# Altium PCB 数控电源.PcbDoc (part 3 of 4)
Units mm, origin at the board's own origin, x right, y up, seen from the top; angles counter-clockwise.
Board outline 99.32 x 99.37 mm, 4 copper layers (Top Layer 1, GND, POWER, Bottom Layer), stack 0.603 mm thick; 325 components, 180 nets, 929 pads, 616 vias.
Unrouted connection lines stored in the file: 13.
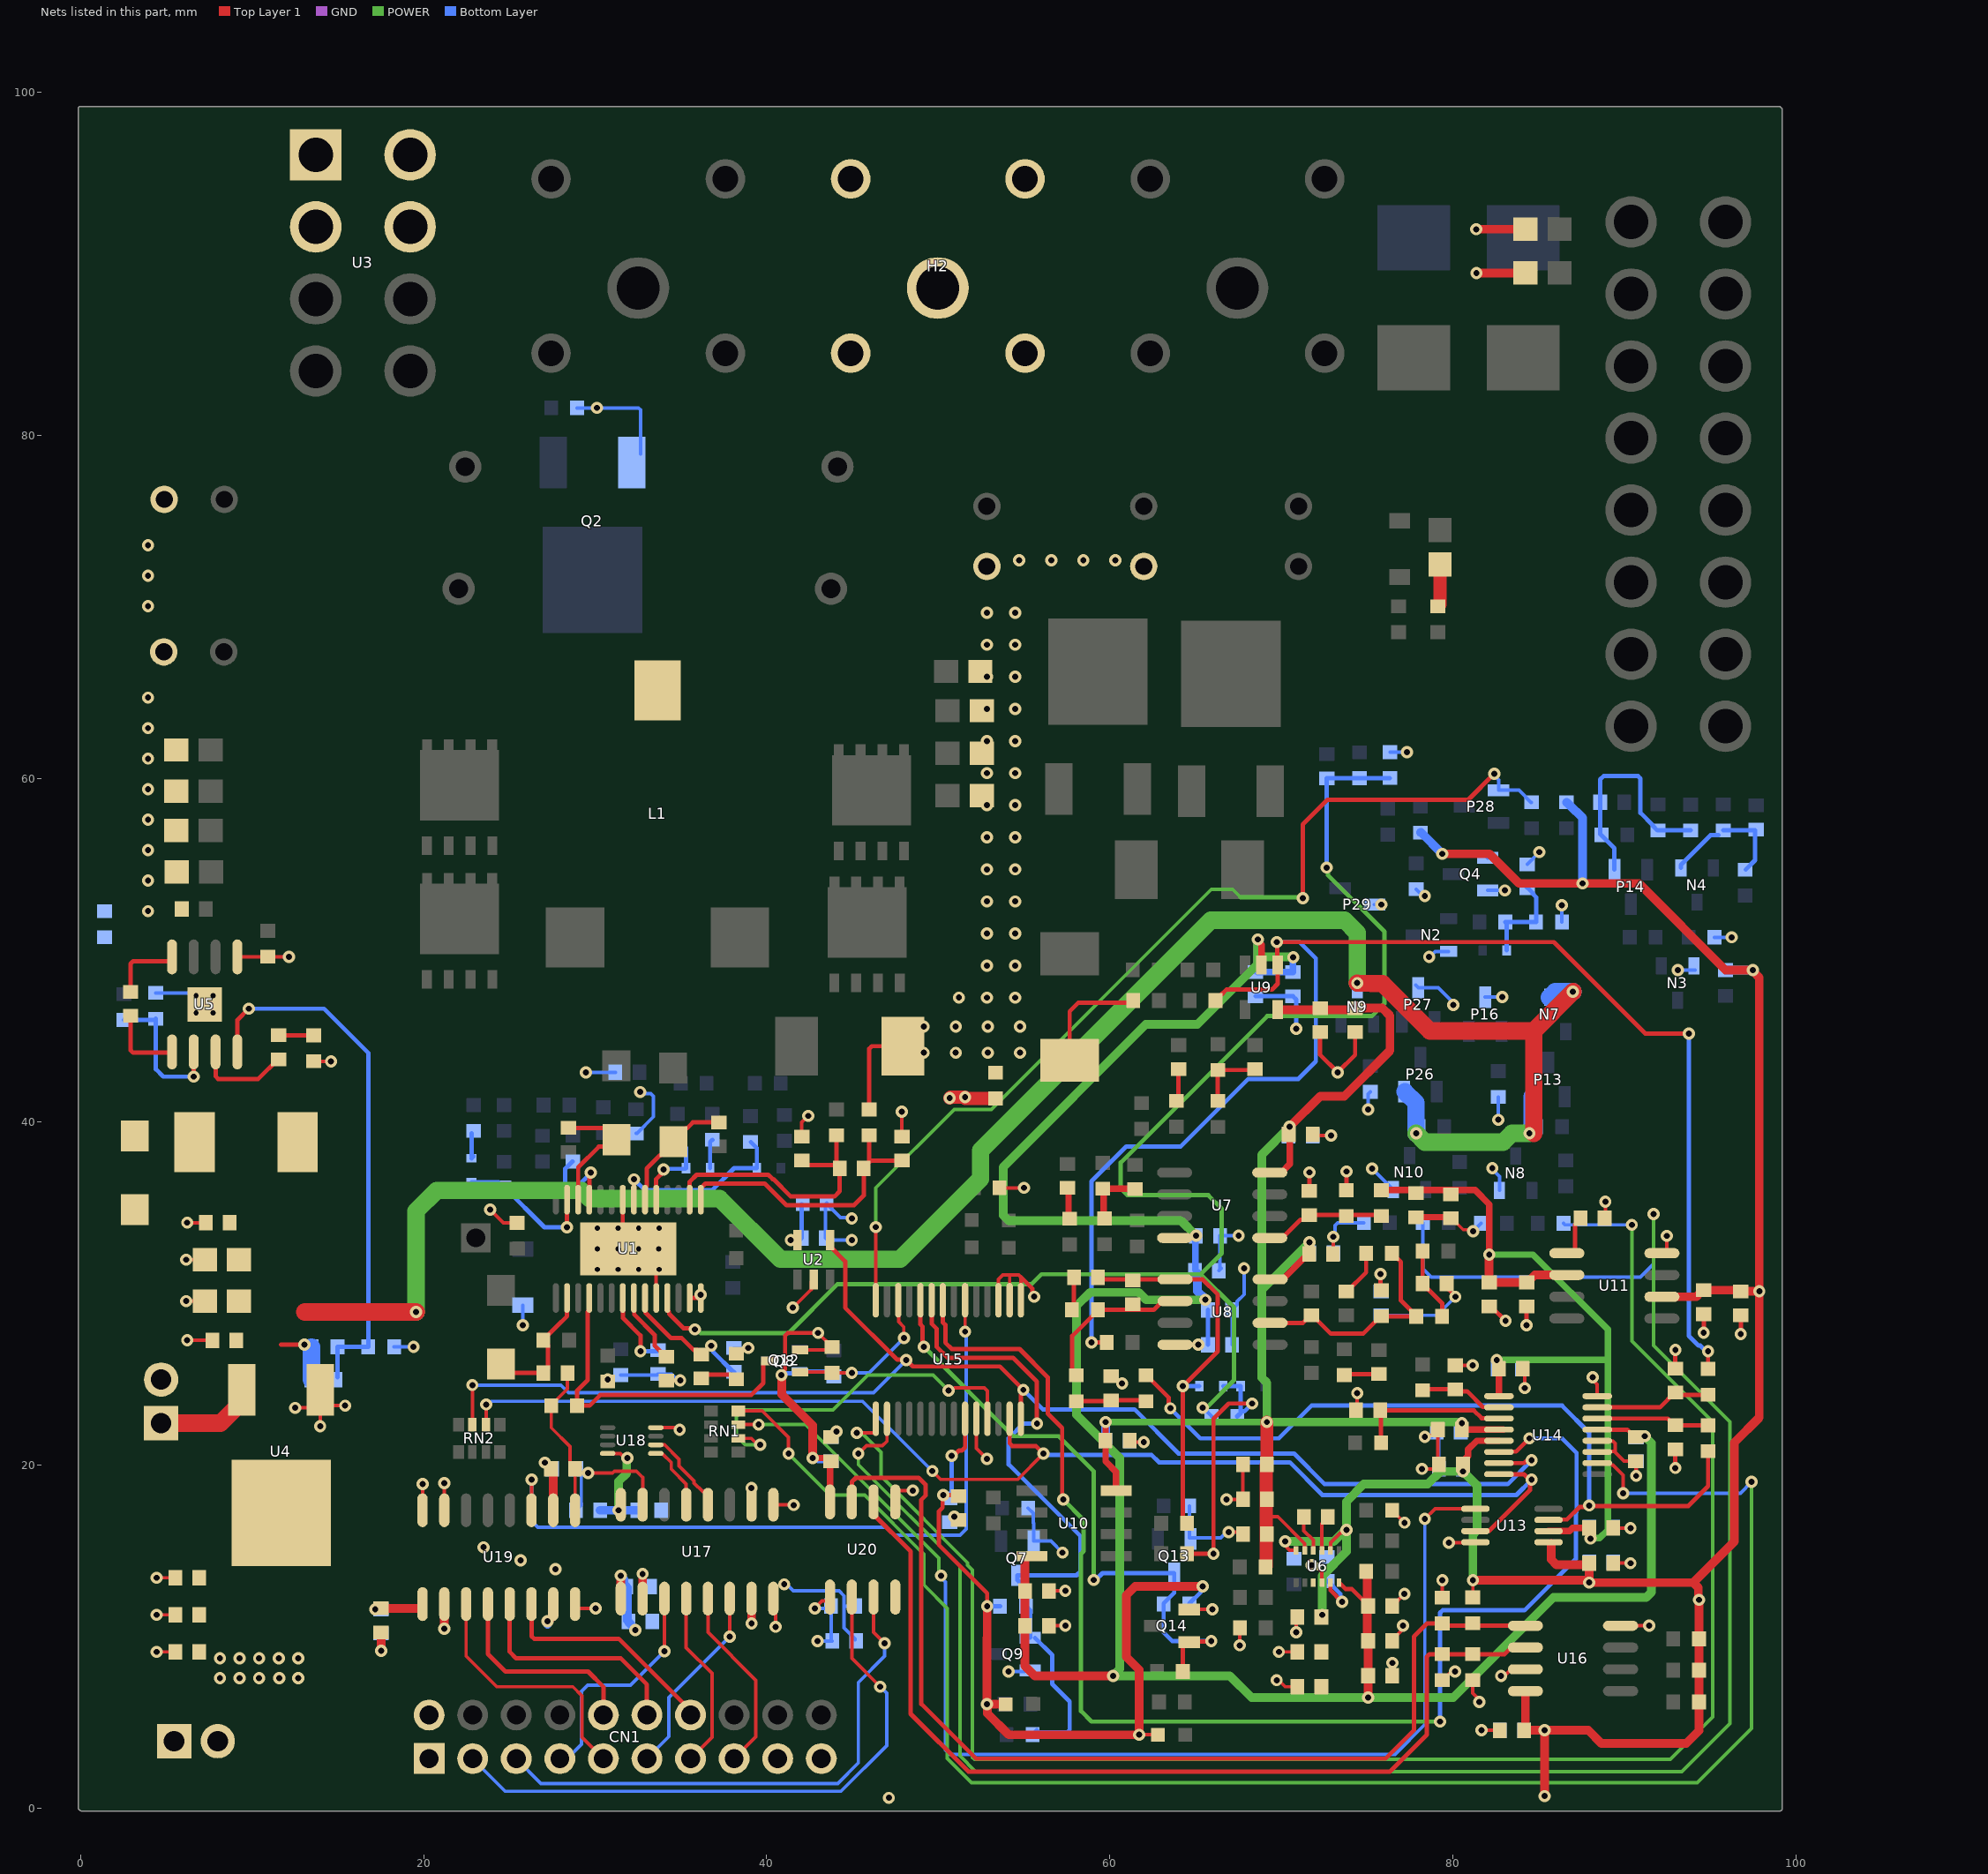
[diagram p4: the nets of this part, all layers, seen from the top]

## Part data (continued)
U18: "工作电压:1.65V~5.5V;输入数/输出数:-;灌电流(IOL):32mA;拉电流(IOH):32mA;", Current - Output High(IOH)=32mA, JLCPCB Part Class="Extended Part", LCSC Part Name=2线-4线译码器, Manufacturer=TI(德州仪器), ManufacturerPart=SN74LVC1G139DCUR, Operating Temperature=-40℃~+85℃, Quiescent Current=10uA, Voltage - Supply=1.65V~5.5V, Voltage Supply Source=单电源, AddInBom=yes, ConvertToPcb=yes, Current - Output Low(IOL)=32mA, Datasheet=https://www.ti.com/cn/lit/gpn/sn74lvc1g139, FootprintName=VSSOP-8_L2.3-W2.0-P0.50-LS3.1-BL, Function=-, ModelId=e6ad324e318e44b4bbc0fe09239e358c, ModelName=VSSOP-8_L2.3-W2.0-P0.50-LS3.1-BR, ModelTransform=122.047,78.74,0,270,0,0,0,-0.002,0, Number of Lines=-, Propagation Delay=4.9ns@3.3V,15pF, Supplier=LCSC, Supplier Footprint=VSSOP-8-0.5mm, SupplierPart=C153798, Symbol=SN74LVC1G139DCUR, Type=解码器
U20: "ISO1540 2.5kVrms、隔离式双向时钟、双向 I2C 隔离器", Isolation Voltage(Vrms)=2500, JLCPCB Part Class="Extended Part", LCSC Part Name=低功耗双向I2C隔离器, Manufacturer=TI(德州仪器), ManufacturerPart=ISO1540DR, Operating Temperature=-40℃~+125℃, AddInBom=yes, Clock Direction=双向, CMTI(kV/us)=50kV/us, ConvertToPcb=yes, Datasheet=https://www.ti.com/cn/lit/gpn/iso1541, FootprintName=SOIC-8_L4.9-W3.9-P1.27-LS6.0-BL, ModelId=e81d2f7d937b4a6ab1dca543ff5d56a4, ModelName=SOIC-8_L4.9-W3.9-H1.7-LS6.0-P1.27, ModelTransform=192.913,236.22,0,0,0,0,0,0,0, Supplier=LCSC, Supplier Footprint=SOIC-8, SupplierPart=C179739, Symbol=ISO1540DR
ZD1 ZD3: library part DIO_ZENER_3, "20V稳压管", Brand=10V
D10 D12 D14 D15 D16: Brand=LED

## Via types
v1: diameter 0.711, hole 0.356, Top Layer 1 to Bottom Layer, 600 vias
v2: diameter 0.5, hole 0.3, Top Layer 1 to Bottom Layer, 12 vias
v3: diameter 0.61, hole 0.305, Top Layer 1 to Bottom Layer, 4 vias

## Nets (pads, with @x,y where several pads share a name; then routed paths per layer and width w, separated by ;. In a path a pad name is that pad's centre, name@x,y a point inside that pad or via, vN(x,y) a via of type N, cw(c..) or ccw(c..) an arc to the next point about the centre after c; other vN are vias at no path point)
+3.3V: C3.2 C21.2 C24.2 C26.2 C52.2 C53.2 C54.2 C72.2 C102.2 C103.2 C106.2 C107.2 C108.2 C109.2 C117.2 C118.2 C119.2 C120.2 C121.2 C122.2 C123.2 C124.2 C139.2 C140.2 D10.2 D12.2 Q8.2 Q12.2 R10.2 R13.2 R31.1 R37.1 R39.1 R44.2 R45.2 R47.1 R98.2 R112.2 R113.2 R114.2 U2.5 U4.2 U6.3 U6.8 U6.12 U11.2 U13.1 U14.13 U15.9 U16.8 U17.10 U17.16 U18.8 U19.10 U19.16 U20.8 | length 233.9
  Top Layer 1 w0.152: U18.8@30.727,20.67 30.732,20.665 31.051,20.665 U18.8@31.056,20.67 ; v1@31.727,20.403 v1(31.878,20.403)
  Top Layer 1 w0.203: U19.16@19.94,17.355 v1(19.94,18.879) ; U18.8@31.051,20.665 31.465,20.665 v1@31.727,20.403 ; Q8.2@41.94,26.707 43.652,26.707 R31.1@43.816,26.871 v1(42.996,27.691) ; v1(61.713,4.267) D12.2@62.791,4.267 ; v1(70.219,15.539) 70.317,15.442 70.317,15.179 70.478,15.018 U6.12@70.859,15.018 ; U6.8@72.858,15.018 72.876,15.036 72.876,15.218 72.878,15.221 72.878,15.467 73.439,16.027 73.479,16.027 73.664,16.212 v1(73.788,16.212) ; R45.2@81.154,7.458 81.154,6.698 81.535,6.317 v1(81.535,6.179) ; R44.2@81.162,12.284 v1(81.162,13.282)
  Top Layer 1 w0.254: v1(27.065,20.133) C118.2@27.43,19.768 ; v1(40.862,25.229) 40.862,25.353 41.071,25.561 41.071,27.542 41.219,27.691 v1(42.996,27.691) ; v1(41.403,33.103) U2.5@41.784,33.103 ; v1(50.78,20.531) 50.903,20.531 51.211,20.838 51.383,20.838 51.563,21.018 U15.9@51.563,22.689 ; C106.2@51.12,18.244 v1(50.293,18.244) 50.253,18.204 50.253,17.507 50.039,17.293 50.039,15.323 52.851,12.511 v1(52.851,11.767)
  Top Layer 1 w0.381: v1(42.673,20.403) 43.547,20.403 C117.2@43.735,20.214 ; U20.8@43.689,17.841 C117.2@43.689,20.168 ; C109.2@80.646,20.276 80.882,20.513 80.882,20.894 81.395,21.406 U14.13@82.678,21.406
  Top Layer 1 w0.508: U19.10@27.56,17.355 C118.2@27.56,19.638 ; v1(39.114,18.658) 39.116,18.657 U17.10@39.117,17.678 U17.10@39.117,17.678 ; v1(40.862,25.229) 40.869,25.222 40.869,24.111 42.673,22.308 v1(42.673,20.403) ; v1(52.851,11.767) 52.851,9.907 52.845,9.901 v1(52.845,6.049) ; D10.2@53.938,6.049 v1(52.845,6.049) ; v1(65.406,12.91) 61.469,12.91 60.961,12.402 60.961,8.802 61.713,8.05 v1(61.713,4.267) 54.11,4.267 52.869,5.508 52.869,6.025 v1(52.845,6.049) ; v1(79.376,55.619) 82.122,55.619 83.845,53.897 v1(87.555,53.897) 90.84,53.897 95.894,48.842 v1(97.483,48.842) ; v1(80.584,19.616) C109.2@80.584,20.022 ; v1(81.162,13.282) 87.741,13.282 87.885,13.139 v1(87.94,13.139) ; C123.2@84.14,4.528 v1(85.345,4.528) ; C123.2@84.223,4.612 U16.8@84.223,6.814 ; v1(85.345,0.693) v1(85.345,4.528) ; U13.1@85.726,15.419 85.726,14.478 86.023,14.18 C103.2@87.842,14.18 ; C103.2@87.94,14.278 v1(87.94,13.139) ; U11.2@92.181,29.801 94.182,29.801 94.42,30.039 94.47,30.039 C3.2@94.616,30.185 96.66,30.185 96.725,30.12 C21.2@96.775,30.12 v1(97.856,30.12) ; v1@97.483,48.787 97.856,48.415 v1(97.856,30.12) ; v1(85.345,4.528) 87.885,4.528 88.647,3.766 93.6,3.766 94.344,4.511 R112.2@94.344,6.179 R114.2@94.344,9.862 v1(94.344,12.135) 94.306,12.174 94.306,12.839 94.006,13.139 ; v1(87.94,13.139) 94.006,13.139 ; 94.006,13.139 96.394,15.526 96.394,21.292 97.856,22.754 v1(97.856,30.12)
  GND w0.203: v1@87.94,13.084 v1(87.94,13.139)
  GND w0.508: v1(80.584,19.616) v1@80.623,19.577
  POWER w0.508: v1(31.37,17.355) 31.37,19.031 31.839,19.501 31.839,20.364 v1(31.878,20.403) ; v1(70.219,15.539) 73.06,15.539 73.733,16.212 v1(73.788,16.212) ; v1(72.391,11.259) 72.391,13.545 73.788,14.942 v1(73.788,16.212) ; v1(81.162,13.282) 81.162,15.942 81.408,16.187 81.408,18.792 v1(80.584,19.616) 79.267,19.616 78.53,18.879 74.804,18.879 73.788,17.863 v1(73.788,16.212)
  Bottom Layer w0.203: v1(87.94,13.139) 87.94,14.3 C102.2@87.947,14.307
  Bottom Layer w0.254: v1@41.086,25.329 41.569,25.329 41.692,25.453 Q12.2@41.911,25.453 43.593,25.453 R47.1@43.884,25.162 ; v1(41.403,33.103) 41.908,33.103 C26.2@42.035,33.23 C24.2@42.035,35.197 ; v1(42.673,20.403) 42.796,20.403 42.985,20.214 C120.2@43.735,20.214 ; v1(50.78,20.531) 50.78,18.328 50.799,18.309 C107.2@50.928,18.309 ; v1(52.851,11.767) R37.1@53.603,11.767 ; R39.1@64.644,11.894 64.644,11.923 65.318,12.597 65.318,12.823 v1(65.406,12.91)
  Bottom Layer w0.508: C121.2@30.292,17.355 v1(31.37,17.355) C122.2@32.448,17.355 ; v1(39.114,18.658) v1@39.114,18.704 ; R10.2@78.106,56.861 78.135,56.861 v1(79.376,55.619) ; C124.2@84.14,4.528 v1(85.345,4.528) ; R13.2@86.615,58.621 86.623,58.63 86.635,58.63 87.177,58.088 87.196,58.088 87.555,57.728 v1(87.555,53.897) ; R98.2@95.886,48.842 v1(97.483,48.842)
  other v1: 8.129,7.576 9.272,7.576 10.415,7.576 11.59,7.577 12.701,7.576 8.129,8.719 9.272,8.719 10.415,8.719 11.558,8.719 12.701,8.719
+3.3V_A: C22.2 C23.2 C59.2 C114.2 C115.2 C116.2 CN1.1 U17.1 U17.7 U19.1 U19.7 U20.1 | length 15.2
  Top Layer 1 w0.203: v1(42.8,11.64) 43.224,12.064 43.511,12.064 43.689,12.242 U20.1@43.689,12.297
  Top Layer 1 w0.508: C116.2@17.527,11.64 19.896,11.64 U19.1@19.94,11.683 ; v1(27.23,10.878) 27.234,10.878 27.56,11.204 U19.7@27.56,11.884 ; U17.1@31.497,12.207 v1(31.497,13.545) ; v1(39.117,10.755) U17.7@39.117,12.207
  Bottom Layer w0.203: v1(42.8,11.64) C22.2@43.624,11.64 ; v1(42.96,9.735) C23.2@43.813,9.735 ; C23.2@43.751,9.797 C22.2@43.751,11.767
  Bottom Layer w0.508: v1(17.181,11.578) C59.2@17.527,11.578 ; v1@27.23,10.7 v1(27.23,10.878) ; v1(31.497,13.545) 31.497,13.49 31.667,13.32 31.667,13.056 C115.2@31.813,12.91 31.876,12.847 C114.2@31.876,10.942 ; C114.2@31.94,10.878 31.94,10.828 32.295,10.473 32.295,10.403 v1(32.334,10.365)
+5V: C44.2 C45.2 C46.1 C48.2 C50.2 H7.1 L2.2 N7.3 N9.3 P13.2 P26.2 R41.1 R82.1 R109.1 U4.3 | length 124.8
  Top Layer 1 w0.254: 11.685,27.007 v1(13.061,27.007)
  Top Layer 1 w1.016: H7.1@4.7,22.435 8.161,22.435 9.399,23.673 U4.3@9.399,24.373 ; 13.082,28.912 v1(19.559,28.912) ; v1(74.423,48.089) 75.906,48.043 78.654,45.295 79.074,45.295 84.71,45.295 ; v1@84.71,39.326 84.71,45.295 ; v1(86.996,47.581) 84.71,45.295
  POWER w1.016: v1(19.559,28.912) 19.559,34.794 20.764,35.999 29.203,35.999 29.674,35.527 37.257,35.527 40.799,31.985 47.778,31.985 52.464,36.672 52.464,38.323 65.89,51.748 73.685,51.748 74.423,51.01 v1(74.423,48.089) ; v1(77.852,39.326) 78.36,38.818 82.926,38.818 83.434,39.326 v1(84.456,39.326)
  Bottom Layer w0.254: v1(13.061,27.007) v1@13.068,27.014
  Bottom Layer w1.016: C46.1@13.46,24.975 R41.1@13.46,26.868 ; P26.2@77.197,41.755 77.852,41.1 v1(77.852,39.326) ; R82.1@84.614,39.484 P13.2@84.614,41.458 ; N7.3@85.63,47.251 85.96,47.581 v1(86.996,47.581)
+VREF: C94.2 C95.2 C98.2 C99.2 C104.2 C105.2 C137.2 C138.2 R55.2 U11.6 U13.2 U14.9 | length 48
  Top Layer 1 w0.381: R55.2@75.592,36.015 81.289,36.015 82.115,35.19 v1(82.115,32.258) ; C98.2@82.675,25.61 82.675,24.008 U14.9@82.678,24.005 ; U13.2@85.571,16.141 85.579,16.15 86.792,16.15 86.968,16.326 C138.2@87.94,16.326
  Top Layer 1 w0.508: v1(82.115,32.258) 82.107,32.25 C94.2@82.107,30.635 C95.2@84.289,30.635 84.339,30.635 84.775,31.071 U11.6@86.636,31.071
  POWER w0.381: v1(82.115,32.258) 84.666,32.258 89.028,27.896 89.028,16.212 88.54,15.725 88.032,15.725 v1(88.012,15.704) ; v1(82.551,26.118) 88.774,26.118
ADC_CS: RN1.8 U14.2 | length 101
  Top Layer 1 w0.203: RN1.8@38.355,23.146 39.736,23.146 41.276,21.606 v1(41.276,20.657) ; U14.2@88.411,20.106 89.143,20.106 89.266,19.983 89.324,19.983 89.917,19.389 v1(89.917,18.346)
  POWER w0.203: v1(41.276,20.657) 43.689,18.244 45.709,18.244 49.092,14.861 49.15,14.804 49.15,13.016 49.209,12.957 50.526,11.64 50.526,2.898 51.944,1.48 94.243,1.48 97.41,4.647 v1(97.41,19.006)
  Bottom Layer w0.203: v1(89.917,18.346) 96.749,18.346 v1(97.41,19.006)
ADC_DRDY/: U14.14 U15.22 | length 77.9
  Top Layer 1 w0.254: U15.22@50.262,29.598 50.262,28.304 50.409,28.158 50.409,27.134 50.79,26.753 54.738,26.753 56.389,25.102 56.389,22.987 57.222,22.153 57.222,18.046 v1(57.278,17.99) ; U14.14@82.678,20.756 82.695,20.773 83.683,20.773 v1(84.456,21.546)
  POWER w0.254: v1(57.278,17.99) 58.471,16.796 58.471,14.967 58.319,14.815 58.319,5.646 58.929,5.036 v1(79.249,5.036)
  Bottom Layer w0.254: v1(79.249,5.036) 79.249,11.372 79.398,11.521 84.168,11.521 87.166,14.519 87.166,17.188 87.205,17.227 87.205,20.702 86.361,21.546 v1(84.456,21.546)
AVDD: C40.2 C41.2 C65.2 C66.2 C67.2 C81.2 C82.2 C84.2 C85.2 C89.2 C90.2 C96.2 C97.2 R49.2 U6.11 U7.8 U8.8 U9.5 U10.8 U14.12 | length 87.4
  Top Layer 1 w0.203: 69.117,16.974 69.796,16.974 71.354,15.416 71.354,15.023 U6.11@71.36,15.018 ; C82.2@74.201,46.535 C82.2@74.296,46.63
  Top Layer 1 w0.254: C65.2@69.117,15.958 C65.2@69.154,15.958
  Top Layer 1 w0.381: C90.2@59.753,21.369 59.753,20.205 60.364,19.594 U10.8@60.364,18.498 ; C90.2@59.756,21.422 v1(59.756,22.497) ; R49.2@69.08,14.053 R49.2@69.117,14.09 ; C67.2@69.117,19.985 C67.2@69.154,20.022 ; U7.8@69.321,37.04 69.994,37.04 70.486,37.532 C41.2@70.486,39.26 ; U8.8@69.343,30.817 70.071,30.817 71.284,32.03 71.409,32.03 71.619,32.239 C84.2@71.619,32.289 71.624,32.294 71.624,32.971 v1(71.629,32.976) ; C41.2@70.428,39.26 70.457,39.289 70.457,39.678 v1(70.486,39.707) ; C97.2@80.519,22.054 U14.12@82.678,22.054 U14.12@82.932,22.054
  Top Layer 1 w0.508: U9.5@69.785,46.535 C82.2@74.201,46.535 ; v1(70.486,39.707) 72.264,41.485 73.661,41.485 76.328,44.152 76.328,46.184 75.882,46.63 C82.2@74.296,46.63 ; C97.2@80.519,22.054 v1(80.519,22.435)
  Top Layer 1 w0.762: R49.2@69.117,14.09 69.117,15.958 69.117,16.974 C67.2@69.117,19.985 ; C67.2@69.154,20.022 v1(69.154,22.497)
  POWER w0.381: v1(59.756,22.497) v1(69.154,22.497)
  POWER w0.508: v1(70.486,39.707) 68.86,38.081 68.86,30.207 ; v1(71.629,32.976) 68.86,30.207 ; v1(80.519,22.435) 80.48,22.474 80.336,22.474 80.313,22.497 v1(69.154,22.497) 69.154,24.783 68.86,25.077 68.86,30.207
  Bottom Layer w0.381: C85.2@71.626,32.341 71.627,32.343 71.627,32.975 v1(71.629,32.976)
  Bottom Layer w0.508: C89.2@59.753,21.419 59.754,21.421 v1@59.754,22.496 ; C96.2@80.457,21.927 80.488,21.958 80.488,22.404 v1(80.519,22.435)
AVSS: C42.2 C43.2 C69.1 C70.1 C71.1 C91.2 C92.2 C100.2 C101.2 C127.2 C128.2 C129.2 C130.2 R118.1 U6.6 U7.4 U8.4 U9.2 U10.4 U14.5 | length 151.7
  Top Layer 1 w0.254: U8.4@63.798,27.007 v1(65.152,27.007) ; U6.6@73.359,13.139 73.371,13.139 73.752,12.758 74.114,12.758 75,11.872 C69.1@75.055,11.817 ; U14.5@88.411,22.054 90.164,22.054 90.6,21.618 C101.2@90.65,21.618 90.705,21.673 v1(91.187,21.673)
  Top Layer 1 w0.381: U7.4@63.776,33.23 63.816,33.27 64.848,33.27 64.935,33.357 v1(65.025,33.357) ; v1(68.621,50.63) 68.621,50.541 68.835,50.327 U9.2@68.835,49.135
  Top Layer 1 w0.508: U10.4@55.099,14.688 55.054,14.642 C92.2@55.054,12.656 C91.2@55.054,10.624 55.054,8.276 55.627,7.703 v1(60.199,7.703) ; R118.1@74.946,13.799 75,13.745 C69.1@75,11.872 ; C69.1@75,11.767 75,9.79 C70.1@75.055,9.735 C71.1@75.055,7.703 v1(75.055,6.436)
  POWER w0.508: v1(65.025,33.357) 64.136,34.246 54.089,34.246 53.792,34.544 53.792,37.364 62.104,45.676 65.107,45.676 68.685,49.255 ; v1(65.558,29.623) 62.115,29.623 61.682,30.055 58.845,30.055 58.065,29.275 58.065,22.918 60.58,20.403 60.58,8.102 60.199,7.721 v1(60.199,7.703) 66.993,7.703 68.26,6.436 80.014,6.436 85.853,12.275 91.27,12.275 91.568,12.573 91.568,21.274 91.187,21.655 v1(91.187,21.673) ; v1@68.625,50.626 68.625,49.314 68.685,49.255 ; v1(70.694,49.593) 70.669,49.619 70.104,49.619 70.098,49.612 69.043,49.612 68.685,49.255
  Bottom Layer w0.254: C130.2@65.722,27.007 C129.2@65.722,29.039
  Bottom Layer w0.381: C42.2@64.992,31.358 64.992,33.325 v1(65.025,33.357) ; v1(68.621,50.63) 68.558,50.567 68.558,48.783 68.623,48.718 C127.2@70.675,48.718 70.675,49.593 v1(70.694,49.593)
  Bottom Layer w0.508: C42.2@65.106,31.179 65.106,30.13 65.558,29.678 v1(65.558,29.623)
CC_ACT: Q13.3 Q14.1 R27.2 R39.2 U15.24 | length 36.6
  Top Layer 1 w0.254: U15.24@48.962,29.598 48.962,28.192 49.076,28.078 49.076,27.262 49.077,26.972 v1(49.164,26.884) ; R27.2@64.254,7.957 64.254,9.451 Q14.1@64.477,9.674 ; Q14.1@64.658,9.705 v1@65.883,9.705
  POWER w0.254: v1(49.164,26.884) 54.375,21.673 57.024,21.673 59.056,19.641 v1(59.056,13.291)
  Bottom Layer w0.254: v1(59.056,13.291) 59.179,13.291 59.576,13.688 Q13.3@63.755,13.688 63.755,12.541 R39.2@63.137,11.923 ; R39.2@63.137,11.894 63.137,10.226 63.628,9.735 v1(65.914,9.735)
CCS: C36.1 C37.2 R28.2 U1.16 | length 15.1
  Top Layer 1 w0.254: U1.16@35.51,36.18 35.51,36.51 35.913,36.913 40.089,36.913 40.343,36.659 40.387,36.659 41.403,35.643 43.943,35.643 44.259,35.959 C37.2@44.259,37.294 ; C36.1@42.038,37.737 42.292,37.483 44.07,37.483 R28.2@44.07,39.208
CSA: U17.13 U18.1 | length 3.9
  Top Layer 1 w0.203: U18.1@33.534,20.67 33.867,20.67 33.905,20.632 33.938,20.632 34.437,20.133 34.437,19.749 35.307,18.879 U17.13@35.307,17.678
CSB: U17.12 U18.2 | length 5.1
  Top Layer 1 w0.203: U18.2@33.534,21.17 33.539,21.165 34.051,21.165 34.894,20.322 34.894,19.938 35.764,19.068 35.764,18.94 36.266,18.439 36.393,18.439 36.577,18.254 U17.12@36.577,17.678
CSG: C37.1 C38.2 R30.2 U1.15 | length 15.9
  Top Layer 1 w0.254: U1.15@36.16,36.132 36.433,36.405 39.879,36.405 41.149,35.135 45.086,35.135 45.659,35.708 C37.1@45.659,37.294 ; C37.1@45.659,37.344 C37.1@45.975,37.66 ; R30.2@45.975,39.208 C37.1@45.975,37.66 ; C38.2@47.88,37.737 46.052,37.737 C37.1@45.975,37.66
CURR_10A: R89.1 U15.2 | length 120.9
  Top Layer 1 w0.203: v1(45.34,20.657) 45.359,20.657 45.817,21.114 46.748,21.114 47.011,21.377 U15.2@47.011,22.689
  POWER w0.203: v1(45.34,20.657) 45.34,20.022 51.258,14.104 51.258,3.035 52.178,2.115 93.34,2.115 96.139,4.914 96.139,22.52 91.695,26.964 v1(91.695,34.627)
  Bottom Layer w0.203: R89.1@78.241,34.119 78.241,31.443 78.733,30.952 90.925,30.952 91.695,31.722 v1(91.695,34.627)
CURR_500mA: R74.1 U15.1 | length 102.6
  Top Layer 1 w0.203: v1(45.255,21.864) 46.287,21.864 46.361,21.938 U15.1@46.361,22.689
  POWER w0.203: v1(45.255,21.864) 45.353,21.766 45.627,21.766 46.661,20.733 46.661,19.348 51.715,14.293 51.715,14.155 51.995,13.875 51.995,2.945 52.114,2.826 92.66,2.826 95.137,5.303 95.137,22.505 90.425,27.217 v1(90.425,33.992)
  Bottom Layer w0.203: R74.1@86.444,34.076 86.528,33.992 v1(90.425,33.992)
CV_ACT: Q7.3 Q9.1 R14.2 R37.2 U15.23 | length 39.8
  Top Layer 1 w0.254: U15.23@49.612,29.598 49.633,29.577 49.633,28.215 49.901,27.947 49.901,26.891 50.547,26.245 54.357,26.245 55.754,24.848 v1(55.754,22.41)
  Bottom Layer w0.254: Q9.1@55.357,9.923 55.357,11.52 R37.2@55.11,11.767 55.11,12.787 54.611,13.286 Q7.3@54.611,13.561 58.056,13.561 58.294,13.799 58.294,15.831 54.105,20.019 54.105,21.549 54.966,22.41 v1(55.754,22.41) ; R14.2@55.491,4.274 55.745,4.528 55.745,4.423 55.767,4.401 57.51,4.401 57.659,4.55 57.659,6.205 56.643,7.221 56.643,8.912 Q9.1@55.632,9.923
DAC_CS: RN1.7 U13.5 | length 70.2
  Top Layer 1 w0.203: RN1.7@38.355,22.346 v1(39.53,22.346) ; v1(78.36,16.847) 78.954,17.441 U13.5@81.309,17.441
  POWER w0.203: v1(39.53,22.346) 42.254,22.346 50.039,14.561 50.039,13.81 50.167,13.683 v1(50.167,13.545)
  Bottom Layer w0.203: v1(39.53,22.346) v1@39.558,22.318 ; v1(50.167,13.545) 50.167,13.425 50.42,13.172 50.42,3.377 50.666,3.131 76.627,3.131 78.36,4.864 v1(78.36,16.847)
DP_EN: P28.1 R33.1 U15.28 | length 58.8
  Top Layer 1 w0.203: v1(46.356,33.865) 46.358,33.863 46.358,29.6 U15.28@46.361,29.598
  Top Layer 1 w0.254: v1(71.248,53.042) 71.248,57.338 72.68,58.771 80.893,58.771 v1(82.414,60.291)
  POWER w0.203: v1(46.356,33.865) 46.356,36.151 50.928,40.723 53.087,40.723 65.914,53.55 67.171,53.55 67.628,53.093
  POWER w0.254: 67.628,53.093 v1@71.197,53.093
  Bottom Layer w0.203: v1(82.414,60.291) 82.414,60.186 82.662,59.938 P28.1@82.662,59.326 83.849,59.326 84.554,58.621 R33.1@84.583,58.621
EER_SCL: R45.1 R46.1 U16.6 U20.6 | length 54.6
  Top Layer 1 w0.254: U20.6@46.229,17.113 48.388,14.954 48.388,5.488 51.761,2.115 76.328,2.115 78.478,4.265 78.478,8.816 78.627,8.964 R46.1@79.376,8.964 R45.1@81.154,8.964 83.015,8.964 U16.6@83.404,9.354
EER_SDA: R44.1 R119.1 U16.5 U20.7 | length 61.9
  Top Layer 1 w0.254: U20.7@44.959,17.841 44.964,17.847 44.964,19.011 45.198,19.245 48.863,19.245 49.251,18.857 49.251,18.203 49.012,17.964 49.012,6.063 52.198,2.877 76.074,2.877 77.725,4.528 77.725,9.989 78.495,10.76 R119.1@79.376,10.76 79.511,10.624 R44.1@81.154,10.624 ; U16.5@84.223,10.624 R44.1@81.154,10.624 ; R44.1@81.154,10.624 R44.1@81.154,10.768 R44.1@81.154,10.624
EN: R32.2 R120.1 U5.2 | length 8.7
  Top Layer 1 w0.254: v1(6.605,42.633) U5.2@6.605,44.075
  Bottom Layer w0.254: R32.2@2.541,45.939 4.326,45.939 R120.1@4.392,46.005 4.392,43.063 4.822,42.633 v1(6.605,42.633)
EXPANDER_CS: RN1.6 U15.11 | length 22
  Top Layer 1 w0.203: RN1.6@38.355,21.546 39.106,21.546 39.487,21.165 v1(39.625,21.165) ; v1(50.598,24.34) 50.695,24.437 50.898,24.437 50.953,24.492 52.688,24.492 52.863,24.318 U15.11@52.863,22.689
  POWER w0.203: v1(39.625,21.165) 38.736,21.165 38.228,21.673 38.228,22.824 38.601,23.197 43.87,23.197 45.902,25.229 49.709,25.229 v1(50.598,24.34)
FB: C25.1 R12.1 R19.2 R73.1 U1.11 | length 93.7
  Top Layer 1 w0.254: U1.11@34.209,29.731 34.209,29.013 34.307,28.915 34.307,28.808 35.143,27.972 35.738,27.972 v1(35.815,27.896)
  POWER w0.254: v1(35.815,27.896) 35.938,27.896 36.153,27.682 41.274,27.682 44.115,30.523 55.424,30.523 56.012,31.111 65.3,31.111 ; v1(65.406,23.333) 65.493,23.42 65.729,23.42 67.241,24.933 67.241,29.17 65.3,31.111 ; v1(72.645,54.82) 72.725,54.74 72.725,54.366 76.004,51.086 76.004,46.895 75.268,46.159 69.172,46.159 60.637,37.624 60.637,36.1 61.018,35.719 65.736,35.719 66.523,34.932 66.523,32.334 65.3,31.111
  Bottom Layer w0.203: v1(65.406,23.333) 65.435,23.333 65.922,22.845 R73.1@65.922,22.816
  Bottom Layer w0.254: v1(72.645,54.82) C25.1@72.645,60.027 R12.1@74.55,60.027 R19.2@76.319,60.027
FB_Contral: D11.2 D13.2 R73.2 R102.1 | length 16.1
  Top Layer 1 w0.254: R102.1@64.499,14.815 v1(66.041,14.815) 66.041,22.689 66.93,23.578 v1(68.29,23.578)
  Bottom Layer w0.254: D13.2@66.612,24.594 D11.2@67.628,24.594 67.628,23.015 R73.2@67.429,22.816 67.429,22.845 67.705,23.121 67.833,23.121 v1(68.29,23.578)
GND: C2.1 C3.1 C4.1 C5.1 C8.1 C9.1 C10.1 C11.1 C12.2 C13.1 C14.2 C15.2 C16.1 C17.1 C18.1 C19.2 C20.1 C21.1 C24.1 C26.1 C34.1 C36.2 C38.1 C40.1 C41.1 C42.1 C43.1 C44.1 C45.1 C48.1 C50.1 C52.1 C53.1 C54.1 C61.1 C62.2 C63.1 C65.1 C66.1 C67.1 C69.2 C70.2 C71.2 C72.1 C73.2 C75.1 C76.1 C81.1 C82.1 C83.2 C84.1 C85.1 C89.1 C90.1 C91.1 C92.1 C93.1 C94.1 C95.1 C96.1 C97.1 C98.1 C99.1 C100.1 C101.1 C102.1 C103.1 C104.1 C105.1 C106.1 C107.1 C108.1 C109.1 C110.1 C111.1 C112.1 C113.1 C117.1 C118.1 C119.1 C120.1 C121.1 C122.1 C123.1 C124.1 C127.1 C128.1 C129.1 C130.1 C133.2 C134.2 C137.1 C138.1 C139.1 C140.1 C141.1 D17.1 H2.1 H2.2 H2.3 H2.4 H2.5 H6.1 H6.2 H7.2 L1.1 N2.2 N3.2 N8.2 N10.2 P16.3 P27.3 P29.3 Q2.3 Q4.2 Q7.2 Q9.2 Q13.2 Q14.2 R1.2 R2.2 R3.2 R4.2 R7.1 R19.1 R29.1 R30.1 R34.2 R40.2 R42.1 R43.2 R46.2 R51.2 R52.1 R53.1 R53.2 R54.1 R54.2 R75.1 R83.2 R84.1 R85.1 R87.2 R95.2 R101.1 R104.2 R115.1 R116.2 R119.2 R120.2 R121.2 R122.2 R123.2 R124.2 U1.10 U1.13 U1.14 U1.22 U1.29 U2.2 U3.1 U3.2 U3.7 U3.8 U4.1 U5.5 U5.9 U6.4 U6.13 U11.4 U13.8 U14.3 U14.4 U14.8 U15.10 U15.15 U15.16 U15.17 U16.4 U16.7 U17.9 U17.15 U18.4 U19.9 U19.15 U20.5 ZD1.2 | length 223.7
  Top Layer 1 w0.203: v1(4.446,9.1) C54.1@5.524,9.1 ; v1(4.446,11.259) C52.1@5.524,11.259 ; v1(4.446,13.418) C53.1@5.524,13.418 ; v1(6.167,29.547) C45.1@7.245,29.547 ; v1(6.167,31.96) C44.1@7.245,31.96 ; v1(6.224,27.261) C50.1@7.683,27.261 ; v1(6.224,34.119) C48.1@7.302,34.119 ; U5.5@9.145,49.613 R42.1@10.914,49.613 ; R42.1@10.923,49.622 v1(12.156,49.622) ; v1(12.512,23.324) U4.1@13.59,23.324 ; R40.2@13.59,43.534 13.607,43.517 v1(14.606,43.517) ; v1(13.971,22.246) U4.1@13.971,23.324 ; U4.1@14.352,23.451 v1(15.43,23.451) ; U19.15@21.21,17.355 v1(21.21,18.93) ; v1(23.877,34.881) 24.646,34.112 R1.2@25.457,34.112 ; R4.2@27.441,23.451 27.441,22.164 28.531,21.074 28.531,20.116 28.664,19.984 28.995,19.984 C118.1@29.128,19.851 ; R4.2@27.441,23.48 28.387,24.425 C2.1@28.387,25.356 ; U19.9@28.83,17.355 C118.1@28.83,19.768 29.079,19.519 v1(29.597,19.519) 31.003,19.519 31.125,19.641 32.394,19.641 32.767,19.268 U17.15@32.767,17.678 ; R3.2@30.735,24.857 v1(30.735,24.975) ; U18.4@33.534,22.171 34.671,22.171 34.788,22.054 v1(34.926,22.054) ; U1.10@33.559,29.731 U1.29@33.559,31.222 ; C9.1@34.164,24.91 34.178,24.924 v1(34.956,24.924) ; v1(36.147,29.923) 36.16,29.923 U1.14@36.16,29.731 ; U17.9@40.387,17.678 41.588,17.678 v1(41.571,17.66) ; v1(41.523,29.172) 41.536,29.172 42.384,30.021 42.59,30.227 42.59,30.652 U2.2@42.734,30.796 ; C36.2@42.038,39.137 42.038,39.961 v1(42.419,40.342) ; U20.5@47.499,17.841 47.499,18.311 47.677,18.488 48.495,18.488 v1(48.515,18.508) ; C38.1@47.88,39.137 v1(47.88,40.596) ; v1(50.928,16.974) 50.928,16.972 51.118,16.782 C106.1@51.182,16.782 ; U15.10@52.213,22.689 52.213,20.972 v1(52.833,20.352) ; U15.17@53.511,29.598 53.511,30.825 53.757,31.071 54.692,31.071 54.811,30.952 U15.15@54.811,29.598 ; R34.2@53.577,36.151 v1(54.992,36.151) ; U15.16@54.161,29.598 54.161,31.008 ; C91.1@56.454,10.624 v1(57.405,10.624) ; C92.1@56.454,12.656 v1(57.405,12.656) ; C133.2@60.072,24.975 60.314,24.975 60.446,24.842 60.618,24.842 v1(60.715,24.745) ; C90.1@61.153,21.419 61.247,21.325 v1(61.977,21.325) ; Q14.2@64.628,11.574 v1(65.98,11.574) ; v1(66.803,17.99) C66.1@67.754,17.99 C67.1@67.754,20.022 ; v1(66.93,16.085) 67.627,16.085 C65.1@67.745,15.967 ; v1(67.565,9.481) 67.565,10.48 R115.1@67.582,10.497 ; v1(69.724,7.449) 69.843,7.449 70.224,7.068 C140.1@70.929,7.068 ; v1(69.851,9.1) C139.1@70.929,9.1 ; v1(70.867,10.243) 70.867,11.07 C72.1@70.929,11.132 ; C41.1@71.821,39.199 v1(72.899,39.199) ; U6.13@72.109,14.012 72.358,13.763 U6.4@72.358,13.139 ; C84.1@73.027,32.298 v1(73.027,33.297) ; C112.1@74.366,23.206 74.423,23.262 v1(74.423,24.188) ; R116.2@76.452,17.355 v1(77.176,16.631) ; C71.2@76.463,7.458 v1(76.463,8.456) ; C70.2@76.467,9.735 76.467,9.797 76.993,10.323 76.993,10.527 v1(77.09,10.624) ; C69.2@76.467,11.767 v1(77.173,12.473) ; v1(78.198,19.768) C109.1@78.93,19.768 ; v1(78.36,21.633) 78.432,21.706 78.82,21.706 79.119,22.004 C109.1@79.119,20.087 ; R46.2@79.376,7.458 79.405,7.458 79.81,7.863 80.023,7.863 v1(80.12,7.96) ; C134.2@79.376,30.563 v1(80.138,29.801) ; R119.2@79.384,12.275 v1(79.384,13.274) ; v1(79.765,15.459) U13.8@80.764,15.459 ; C105.1@79.934,34.373 80.599,33.708 v1@81.074,33.708 ; C113.1@80.146,25.793 v1(81.145,25.793) ; v1(81.662,4.528) C123.1@82.74,4.528 ; v1(82.805,7.703) 82.902,7.8 83.107,7.8 83.391,8.084 U16.7@83.821,8.084 ; v1(84.193,24.476) C98.1@84.193,25.474 ; C76.1@84.209,89.483 C76.1@84.218,89.491 ; v1(88.139,25.102) 88.139,24.965 88.411,24.693 U14.8@88.411,24.005 ; U14.3@88.411,20.756 88.437,20.783 89.416,20.783 ; U14.4@88.411,21.406 88.437,21.38 89.329,21.38 89.448,21.261 89.448,20.816 89.416,20.783 ; C93.1@88.88,34.35 v1(88.88,35.348) ; C103.1@89.348,14.27 v1(90.347,14.27) ; C138.1@89.348,16.318 v1(90.347,16.318) ; U16.4@89.768,10.624 v1(91.441,10.624) ; C101.1@90.65,20.218 89.98,20.218 89.416,20.783 ; U11.4@92.465,32.35 v1(92.465,33.348)
  Top Layer 1 w0.254: U1.29@31.609,32.922 U1.22@31.609,35.462 ; U1.10@33.559,29.705 U1.10@33.559,29.731 ; U1.13@35.51,29.731 U1.14@36.147,29.731 ; R30.1@45.975,40.714 45.975,44.257 46.124,44.406 R29.1@48.314,44.406 ; 54.811,30.952 55.497,30.267 55.497,29.891 v1(55.584,29.804) ; R84.1@57.659,43.593 57.659,46.438 58.167,46.946 61.232,46.946 R87.2@61.359,47.073 ; C73.2@71.629,35.962 71.629,37.05 v1(71.63,37.051) ; C81.1@72.264,45.23 72.264,43.898 v1(73.28,42.882) 74.296,43.898 C82.1@74.296,45.23 ; R52.1@73.788,36.015 v1@73.788,37.103 ; C94.1@82.297,29.166 v1(83.066,28.395) ; v1@84.289,28.148 C95.1@84.289,29.235 ; C101.1@90.65,20.218 90.679,20.189 v1(90.679,19.362) ; v1@92.965,19.821 C111.1@92.965,20.908 ; C110.1@92.965,25.61 v1@92.965,26.698 ; v1@94.616,27.698 C3.1@94.616,28.785 ; v1@96.775,27.633 C21.1@96.775,28.72
  Top Layer 1 w0.356: C104.1@77.852,34.435 C105.1@79.872,34.435
  Top Layer 1 w0.508: R54.1@53.303,41.396 R54.1@53.341,41.358 ; v1(81.356,92.031) C83.2@84.218,92.031 ; v1(81.371,89.483) C76.1@84.209,89.483
  Top Layer 1 w0.762: v1(50.664,41.383) 50.714,41.434 v1(51.563,41.434) ; v1@51.563,41.358 53.29,41.358 53.303,41.371 R54.1@53.303,41.38
  POWER w0.203: v1@41.485,17.66 v1(41.571,17.66) ; v1@67.49,33.34 v1(67.507,33.357) ; v1@78.272,21.546 v1(78.36,21.633)
  Bottom Layer w0.203: R120.2@4.392,47.511 6.462,47.511 v3@6.63,47.344 ; R43.2@18.28,26.88 v1(19.416,26.88) ; v1(25.782,28.15) ZD1.2@25.782,29.308 ; C121.1@28.892,17.355 29.19,17.653 29.19,19.356 29.256,19.422 29.5,19.422 v1(29.597,19.519) ; R75.1@28.948,81.617 v1(30.1,81.617) 32.521,81.617 32.64,81.498 Q2.3@32.64,78.94 ; v1(29.465,42.882) C5.1@31.178,42.882 ; R2.2@31.497,25.238 C8.1@33.602,25.238 ; C4.1@32.386,39.326 32.436,39.326 33.402,40.292 33.402,41.485 33.248,41.639 v1@32.719,41.639 ; C8.1@33.656,25.291 34.451,25.291 v1@34.818,24.924 ; v1@34.956,24.872 v1(34.956,24.924) ; v1(36.147,29.923) v1@36.157,29.923 ; C10.1@38.101,26.818 v1(38.928,26.818) ; C24.1@43.509,35.271 C24.1@43.5,35.262 ; C120.1@43.735,21.615 v1(44.07,21.949) ; v1(44.959,33.103) 43.562,33.103 C26.1@43.435,33.23 43.435,35.197 C24.1@43.5,35.262 ; v1(44.959,34.373) 44.918,34.414 44.298,34.414 43.5,35.212 C24.1@43.5,35.262 ; v1(54.103,7.957) 55.291,7.957 Q9.2@55.357,8.023 ; R121.2@55.237,17.482 55.539,17.18 55.539,16.629 55.561,16.607 Q7.2@55.561,15.561 56.57,15.561 v1(57.244,14.886) ; R124.2@64.635,17.609 64.635,15.758 66.465,15.758 v1@66.792,16.085 ; C42.1@66.36,31.325 C42.1@66.487,31.452 ; C42.1@66.425,31.452 C43.1@66.425,33.357 v1(67.507,33.357) ; C130.1@67.122,27.007 C129.1@67.122,29.039 67.42,29.337 67.42,29.53 67.819,29.928 v1(67.819,31.452) ; v1(73.027,33.297) 73.118,33.387 73.118,33.957 73.28,34.119 R123.2@74.812,34.119 ; v1(75.058,40.723) 75.058,41.621 R122.2@75.185,41.748 ; v1(75.29,37.272) N10.2@76.521,36.042 ; P29.3@75.423,52.661 v1(75.82,52.661) ; C75.1@75.82,28.72 79.057,28.72 v1(80.138,29.801) ; R19.1@76.328,61.542 v1(77.313,61.542) ; v1@77.176,16.59 v1(77.176,16.631) ; P27.3@77.836,47.962 P27.3@77.979,47.819 79.138,47.819 80.011,46.946 v1(80.011,46.819) ; R85.1@77.852,53.559 78.241,53.169 v1(78.36,53.169) ; v1(78.198,19.768) C108.1@79.184,19.768 C96.1@79.184,21.8 ; v1(78.36,21.633) 78.763,21.633 C96.1@79.057,21.927 ; v1(78.614,49.613) 78.647,49.613 78.967,49.933 N2.2@79.739,49.933 ; v1(81.171,33.611) R104.2@81.636,34.076 ; P16.3@81.881,47.268 v1(82.867,47.268) ; Q4.2@82.027,53.489 v1(83.031,53.489) ; v1(82.297,37.294) 82.297,37.216 82.709,36.804 N8.2@82.709,35.999 ; v1(82.643,40.115) R95.2@82.643,41.45 ; C62.2@84.329,55.012 v1(85.039,55.722) ; R83.2@86.352,51.645 v1(86.352,52.631) ; v1(93.104,48.851) N3.2@94.108,48.851 ; R101.1@95.242,50.756 v1(96.246,50.756)
  Bottom Layer w0.254: C128.1@68.493,47.318 C127.1@70.675,47.318 70.867,47.126 v1(70.867,45.422)
  other v1: 71.756,14.158 92.963,19.819 92.966,26.699 96.773,27.631 94.614,27.696 84.288,28.146 73.789,37.104 32.622,41.736 49.15,44.025 51.02,44.025 52.891,44.025 54.761,44.025 49.15,45.549 51.02,45.549 52.891,45.549 54.761,45.549 52.833,47.234 54.484,47.234 51.203,47.24 52.833,49.105 54.484,49.105 52.833,50.975 54.484,50.975 3.938,52.28 52.833,52.846 54.484,52.846 3.938,54.058 52.833,54.716 54.484,54.716 3.938,55.836 52.833,56.586 54.484,56.586 3.938,57.614 52.833,58.457 54.484,58.457 3.938,59.392 52.833,60.327 54.484,60.327 3.938,61.17 52.833,62.198 54.484,62.198 3.938,62.948 52.833,64.068 54.484,64.068 3.938,64.726 52.833,65.938 54.484,65.938 52.833,67.809 54.484,67.809 52.833,69.679 54.484,69.679 3.938,70.06 3.938,71.838 54.715,72.727 56.585,72.727 58.455,72.727 60.326,72.727 3.938,73.616
  other v2: 30.133,31.398 31.334,31.398 32.533,31.398 33.735,31.398 30.133,32.597 31.334,32.597 32.533,32.597 33.712,32.597 30.133,33.798 31.334,33.798 32.533,33.798 33.735,33.798
  other v3: 6.74,46.344 7.74,46.344 6.74,47.344 7.74,47.344
GNDA: C22.1 C23.1 C59.1 C114.1 C115.1 C116.1 CN1.2 CN1.17 CN1.19 U17.2 U17.8 U19.2 U19.8 U20.4 | length 13.4
  Top Layer 1 w0.203: U19.8@28.957,11.64 v1(30.035,11.64) ; v1(40.514,10.562) U17.8@40.514,11.64
  Top Layer 1 w0.508: v1(17.527,9.166) C116.1@17.527,10.24 ; v1(21.21,10.441) U19.2@21.21,11.884 ; U17.2@32.767,12.207 v1(32.767,13.647)
  Bottom Layer w0.203: v1(32.767,13.647) v1@32.767,13.661 ; v1(41.022,13.037) 41.159,13.037 41.544,12.653 44.218,12.653 44.506,12.364 44.506,11.767 ; C23.1@45.151,9.797 45.151,9.847 44.497,10.501 44.497,11.129 44.506,11.139 44.506,11.767 ; C22.1@45.151,11.767 44.506,11.767
  other v1: 47.118,0.591 27.687,13.926 25.655,14.434 23.496,15.196
HD1: D5.2 R20.2 U1.27 | length 8.2
  Top Layer 1 w0.254: v1(28.36,33.848) U1.27@28.36,35.462
  Bottom Layer w0.254: D5.2@22.79,36.47 24.366,36.47 R20.2@24.666,36.17 ; R20.2@24.723,36.17 27.045,33.848 v1(28.36,33.848)
HD2: D6.2 R21.2 U1.19 | length 5.2
  Top Layer 1 w0.254: U1.19@33.559,35.462 33.559,36.667 33.986,37.094 v1(33.986,37.218)
  Bottom Layer w0.254: v1(33.986,37.218) 34.025,37.257 35.26,37.257 D6.2@35.299,37.296 35.299,38.482 34.828,38.954 R21.2@34.799,38.954
I_MON: R80.2 R86.2 R107.1 U9.1 | length 87.7
  Top Layer 1 w0.254: v1(58.929,27.134) R80.2@59.818,27.134 ; R86.2@66.159,47.073 66.159,47.102 66.435,47.378 66.464,47.378 66.794,47.708 69.448,47.708 69.785,48.045 U9.1@69.785,49.135 69.763,49.157 v1@69.763,50.454 ; v1@69.763,50.476 85.879,50.476 91.212,45.143 v1(93.752,45.143) ; R107.1@94.87,25.593 v1(94.87,26.626)
  Bottom Layer w0.254: v1(58.929,27.134) 58.929,36.532 60.961,38.564 64.136,38.564 68.073,42.501 70.994,42.501 72.01,43.517 72.01,49.53 71.064,50.476 v1(69.74,50.476) ; v1(93.752,45.143) 93.752,27.517 94.309,26.96 94.412,26.96 94.746,26.626 v1(94.87,26.626)
I_SERVO: C57.2 C58.2 D13.1 R110.1 U8.1 | length 22.3
  Top Layer 1 w0.254: C58.2@59.313,30.944 59.44,30.817 U8.1@63.798,30.817 65.406,30.817 66.295,29.928 66.295,26.626 v1(64.263,24.594) R110.1@64.263,16.83
  Bottom Layer w0.254: v1(64.263,24.594) D13.1@65.213,24.594
I_SET_OUT: R78.2 R105.1 U13.3 | length 45.5
  Top Layer 1 w0.254: R78.2@62.104,25.22 62.133,25.22 63.439,23.914 63.439,23.385 v1(63.526,23.297) ; U13.3@85.571,16.791 85.592,16.812 86.646,16.812 87.381,17.547 87.854,17.547 v1(87.942,17.634) 87.967,17.609 93.727,17.609 94.87,18.752 R105.1@94.87,20.801
  Bottom Layer w0.254: v1(63.526,23.297) 65.277,21.546 69.851,21.546 71.756,23.451 86.361,23.451 87.942,21.87 v1(87.942,17.634)
IRQ: U15.20 U19.11 | length 43.4
  Top Layer 1 w0.203: U19.11@26.29,17.355 v1(26.29,19.133) ; v1(51.563,27.769) U15.20@51.563,29.598
  Bottom Layer w0.203: v1(26.29,19.133) 26.29,16.724 26.649,16.364 46.989,16.364 47.454,15.899 51.271,15.899 51.639,16.267 51.639,27.693 v1(51.563,27.769)
LD1: D9.2 R25.2 U1.25 | length 5.2
  Top Layer 1 w0.254: U1.25@29.658,35.462 29.675,35.479 29.675,36.964 v1(29.747,37.035)
  Bottom Layer w0.254: R25.2@28.703,37.684 28.674,37.684 28.258,37.268 D9.2@28.258,36.151 28.889,36.151 29.747,37.008 v1(29.747,37.035)
LD2: D8.2 R26.2 U1.21 | length 10.8
  Top Layer 1 w0.254: U1.21@32.259,35.462 32.264,35.467 32.264,36.639 v1(32.27,36.645)
  Bottom Layer w0.254: v1(32.27,36.645) 32.284,36.659 32.284,36.631 32.891,36.024 36.831,36.024 38.102,37.296 D8.2@39.427,37.296 39.427,38.476 R26.2@39.074,38.828
MISO: RN2.7 U2.4 U14.15 U15.14 | length 81.6
  Top Layer 1 w0.203: RN2.7@22.843,22.346 v1(22.843,24.653)
  Top Layer 1 w0.254: U2.4@43.684,33.103 43.684,32.761 44.578,31.867 44.578,29.166 47.613,26.131 48.121,26.131 48.515,25.737 53.595,25.737 v1(54.959,24.373) 54.959,24.249 54.811,24.102 U15.14@54.811,22.689 ; U14.15@82.678,20.106 84.162,20.106 84.245,20.189 84.495,20.189 v1(84.583,20.276)
  Bottom Layer w0.203: v1@22.93,24.74 v1(22.843,24.653) 22.93,24.653 28.009,24.653 28.449,24.213 46.229,24.213 v1(48.134,26.118)
  Bottom Layer w0.254: v1(54.959,24.373) 56.098,23.234 61.432,23.234 64.009,20.657 70.74,20.657 72.518,18.879 83.186,18.879 v1(84.583,20.276)
MMT_CSA: CN1.13 U17.4 | length 10.5
  Top Layer 1 w0.203: U17.4@35.307,12.207 35.307,9.354 36.817,7.844 36.817,4.133 CN1.13@35.561,2.877
MMT_CSB: CN1.15 U17.5 | length 11
  Top Layer 1 w0.203: U17.5@36.577,12.207 36.577,10.243 39.371,7.449 39.371,4.147 CN1.15@38.101,2.877
MMT_IRQ: CN1.14 U19.6 | length 12.9
  Top Layer 1 w0.254: U19.6@26.29,11.884 26.29,10.011 26.439,9.862 31.37,9.862 CN1.14@35.561,5.671
MMT_MISO: CN1.11 U17.6 | length 11.3
  Top Layer 1 w0.203: v1(37.847,9.989) U17.6@37.847,12.207
  Bottom Layer w0.203: CN1.11@33.021,2.877 34.305,4.161 34.305,6.447 v1(37.847,9.989)
MMT_MOSI: CN1.9 U19.3 | length 14.9
  Top Layer 1 w0.203: U19.3@22.48,11.884 22.48,8.846 24.258,7.068 28.703,7.068 29.225,6.546 29.225,4.133 CN1.9@30.481,2.877
MMT_NRESET: CN1.12 U19.5 | length 13.4
  Top Layer 1 w0.254: U19.5@25.02,11.884 25.02,9.1 25.401,8.719 31.497,8.719 33.021,7.195 CN1.12@33.021,5.417
MMT_SCL: CN1.5 U20.3 | length 31.6
  Top Layer 1 w0.203: U20.3@46.229,12.297 46.229,10.243 v1(46.864,9.608)
  Bottom Layer w0.203: CN1.5@25.401,2.877 26.849,1.429 44.134,1.429 45.34,2.635 45.34,7.322 46.864,8.846 v1(46.864,9.608)
MMT_SCLK: CN1.7 U17.3 | length 13.6
  Top Layer 1 w0.203: v1(34.037,9.13) U17.3@34.037,12.207
  Bottom Layer w0.203: CN1.7@27.941,2.877 28.373,2.877 29.197,3.701 29.197,6.8 29.555,7.158 32.065,7.158 v1(34.037,9.13)
MMT_SDA: CN1.3 U20.2 | length 35.5
  Top Layer 1 w0.203: U20.2@44.959,12.297 44.959,8.719 v1(46.61,7.068)
  Bottom Layer w0.203: CN1.3@22.861,2.877 24.766,0.972 44.324,0.972 46.991,3.639 46.991,6.687 v1(46.61,7.068)
MMT_SYNC: CN1.10 U19.4 | length 12.1
  Top Layer 1 w0.254: U19.4@23.75,11.884 23.75,8.978 24.771,7.957 29.592,7.957 30.481,7.068 CN1.10@30.481,5.417
MODE_MPPT: Q8.3 R4.1 U1.4 | length 19.5
  Top Layer 1 w0.254: U1.4@29.658,29.731 29.658,29.013 29.563,28.917 29.563,24.946 28.948,24.331 R4.1@28.948,23.451 29.671,23.451 30.293,24.072 31.325,24.072 31.338,24.086 39.117,24.086 39.803,24.772 39.803,25.934 39.879,25.934 40.002,26.057 Q8.3@40.145,26.057
MODE_MPPT_EN: Q8.1 R31.2 U15.26 | length 9.3
  Top Layer 1 w0.203: Q8.1@41.94,25.407 43.774,25.407 43.824,25.356 v1(44.959,25.356) ; U15.26@47.661,29.598 47.692,29.567 47.692,28.345 47.988,28.048 47.988,27.407 v1(48.007,27.388)
  Bottom Layer w0.203: v1(44.959,25.356) 45.975,25.356 v1(48.007,27.388)
MOSI: RN2.6 U13.7 U14.16 U15.13 | length 76.4
  Top Layer 1 w0.203: RN2.6@23.643,22.346 v1(23.643,23.522) ; v1(49.658,19.641) 50.145,19.154 54.632,19.154 v1(56.135,20.657)
  Top Layer 1 w0.254: U15.13@54.161,22.689 54.161,21.255 54.31,21.107 55.685,21.107 v1(56.135,20.657) ; U13.7@81.33,16.162 82.125,16.162 84.495,18.533 84.495,19.046 v1(84.583,19.133) ; U14.16@82.678,19.456 84.136,19.456 v1@84.459,19.133
  Bottom Layer w0.203: v1(23.643,23.522) 23.781,23.522 23.964,23.705 45.594,23.705 v1(49.658,19.641)
  Bottom Layer w0.254: v1(56.135,20.657) 56.204,20.588 62.425,20.588 62.864,20.149 70.486,20.149 72.391,18.244 83.694,18.244 v1(84.583,19.133)
NetC1_1: C1.1 D2.2 U1.26 | length 7.9
  Top Layer 1 w0.254: C1.1@28.449,39.645 30.57,39.645 D2.2@31.253,38.962 ; U1.26@29.01,35.462 29.01,37.347 30.21,38.548 30.845,38.548 D2.2@31.253,38.955
NetC2_2: C2.2 D1.2 R5.1 U1.2 | length 7.9
  Top Layer 1 w0.254: D1.2@24.522,25.874 25.04,25.356 C2.2@26.987,25.356 27.257,25.626 27.257,26.986 R5.1@26.981,27.263 26.981,27.291 27.765,28.076 28.36,28.671 U1.2@28.36,29.731
NetC6_2: C6.2 D3.2 U1.20 | length 7.3
  Top Layer 1 w0.254: U1.20@32.909,35.462 32.909,36.18 33.007,36.278 33.007,37.28 33.781,38.055 33.872,38.055 34.555,38.738 34.555,38.918 35.238,39.602 35.328,39.602 35.688,39.961 C6.2@37.212,39.961
NetC7_1: C7.1 R7.2 | length 2.2
  Top Layer 1 w0.254: C7.1@36.196,25.037 36.419,25.26 37.952,25.26 R7.2@38.228,24.984
NetC7_2: C7.2 C10.2 U1.9 | length 7.9
  Top Layer 1 w0.254: U1.9@32.909,29.731 32.926,29.714 32.926,28.889 34.427,27.388 35.053,27.388 35.731,26.71 35.973,26.71 36.246,26.437 36.754,26.945 v1(36.769,26.945)
  Bottom Layer w0.254: v1@36.856,26.858 36.856,26.612 38.051,25.418 C10.2@38.101,25.418
NetC8_2: C8.2 U1.7 | length 4.5
  Top Layer 1 w0.254: U1.7@31.609,29.731 31.626,29.714 31.626,28.555 32.64,27.541 v1(32.64,26.626)
  Bottom Layer w0.254: v1(32.64,26.626) C8.2@33.591,26.626
NetC9_2: C9.2 U1.8 | length 4.2
  Top Layer 1 w0.254: U1.8@32.259,29.731 32.276,29.714 32.276,28.768 33.475,27.569 33.475,26.949 34.114,26.31 C9.2@34.164,26.31
NetC29_1: C29.1 D17.2 L2.1 U5.1 | length 4.4
  Top Layer 1 w0.254: C29.1@2.922,46.181 2.922,44.174 3.071,44.025 U5.1@5.285,44.025
NetC29_2: C29.2 U5.8 | length 4.2
  Top Layer 1 w0.254: C29.2@2.922,47.581 2.922,49.21 3.071,49.359 5.187,49.359 U5.8@5.335,49.507
NetC39_1: C39.1 R48.2 R63.1 R65.1 U8.6 | length 13.9
  Top Layer 1 w0.254: U8.6@69.343,28.277 71.263,28.277 71.706,28.72 C39.1@71.756,28.72 71.806,28.72 72.884,27.642 74.766,27.642 75.791,28.667 R63.1@75.82,28.667 77.852,28.667 R65.1@77.86,28.658 77.86,28.687 76.963,29.584 76.963,31.824 76.751,32.036 76.722,32.036 76.446,32.312 R48.2@76.446,32.341
NetC46_2: C46.2 R41.2 R43.1 U5.4 | length 31.5
  Top Layer 1 w0.254: U5.4@9.145,44.075 9.145,45.93 v1(9.808,46.593)
  Bottom Layer w0.254: v1(9.808,46.593) 14.197,46.593 16.773,44.016 R43.1@16.773,26.88 R41.2@14.978,26.88 C46.2@14.978,25.093
NetC55_1: C55.1 R40.1 | length 2
  Top Layer 1 w0.254: C55.1@11.558,45.044 R40.1@13.587,45.044
NetC55_2: C55.2 U5.3 | length 5.6
  Top Layer 1 w0.254: U5.3@7.875,44.075 7.875,42.65 8.024,42.501 10.365,42.501 11.508,43.644 C55.2@11.558,43.644
NetC56_1: C56.1 R48.1 | length 2.7
  Top Layer 1 w0.254: C56.1@73.788,30.12 73.838,30.12 74.939,31.222 R48.1@74.939,32.341
NetC57_1: C57.1 R36.1 R64.2 U8.2 | length 9.2
  Top Layer 1 w0.254: R36.1@58.04,25.22 57.811,25.449 57.811,27.52 59.301,29.01 R64.2@59.301,29.039 62.561,29.039 63.069,29.547 U8.2@63.798,29.547
NetC58_1: C58.1 R64.1 | length 2
  Top Layer 1 w0.254: R64.1@57.794,29.039 57.913,29.157 C58.1@57.913,30.944
NetC62_1: C62.1 D18.1 Q4.1 R83.1 R91.2 | length 8.7
  Bottom Layer w0.254: Q4.1@82.027,55.389 82.302,55.389 83.806,53.885 84.106,53.885 84.652,53.339 84.652,53.289 84.845,53.095 R83.1@84.845,51.645 R91.2@83.05,51.645 83.125,51.57 D18.1@83.125,49.994
NetC64_1: C64.1 R35.2 | length 2.5
  Top Layer 1 w0.762: R35.2@79.122,70.051 79.151,70.051 79.249,70.15 C64.1@79.249,72.489
NetC68_1: C68.1 U6.9 | length 2.1
  Top Layer 1 w0.203: U6.9@72.358,15.018 72.358,16.572 72.71,16.924 C68.1@72.71,16.974
NetC68_2: C68.2 U6.10 | length 2.2
  Top Layer 1 w0.203: C68.2@71.31,16.974 71.31,16.169 71.86,15.619 U6.10@71.86,15.018
NetC73_1: C73.1 R52.2 R55.1 U7.5 | length 7.1
  Top Layer 1 w0.254: U7.5@69.321,33.23 70.05,33.23 71.109,34.289 71.356,34.289 C73.1@71.629,34.562 75.766,34.562 R55.1@75.82,34.509
NetC74_2: C74.2 R58.2 | length 1.9
  Top Layer 1 w0.254: R58.2@63.882,41.222 64.009,41.349 C74.2@64.009,43.071
NetC75_2: C75.2 R63.2 | length 2
  Top Layer 1 w0.254: v1(75.78,31.13) 75.78,30.213 R63.2@75.82,30.173
  Bottom Layer w0.254: v1(75.78,31.13) 75.78,30.16 C75.2@75.82,30.12
NetC77_2: C77.2 R61.1 R62.2 | length 4
  Top Layer 1 w0.254: R62.2@66.295,41.214 R61.1@66.295,43.018 68.4,43.018 C77.2@68.454,43.071
NetC78_2: C78.2 R69.1 R70.2 | length 3.7
  Top Layer 1 w0.381: R69.1@59.585,36.095 R69.1@59.59,36.091 ; R70.2@59.691,34.364 59.638,34.417 59.638,36.042 R69.1@59.59,36.091 ; C78.2@61.469,36.086 61.464,36.091 R69.1@59.59,36.091
NetC79_2: C79.2 R68.2 | length 2.1
  Top Layer 1 w0.254: R68.2@73.661,25.238 73.714,25.291 C79.2@75.693,25.291
NetC80_2: C80.2 R72.2 | length 1.8
  Top Layer 1 w0.381: C80.2@57.532,36.151 57.595,36.088 57.595,34.419 R72.2@57.659,34.356
NetC86_1: C86.1 P14.1 R90.1 R94.2 R97.1 | length 13.5
  Bottom Layer w0.254: P14.1@89.414,54.693 89.414,55.938 88.582,56.77 C86.1@88.582,58.63 88.582,59.962 88.774,60.154 90.784,60.154 90.933,60.005 90.933,58.004 91.644,57.293 91.644,57.264 91.92,56.988 R97.1@93.845,56.988
NetC88_2: C88.2 N4.1 R100.2 R103.1 | length 7.5
  Bottom Layer w0.254: N4.1@93.285,54.802 93.285,54.978 95.019,56.711 R100.2@95.483,56.711 ; R100.2@95.759,56.988 97.61,56.988 97.61,55.246 R103.1@97.058,54.693
NetC93_2: C93.2 U11.5 | length 2.6
  Top Layer 1 w0.254: U11.5@86.636,32.341 86.968,32.341 87.123,32.495 87.123,34.007 87.439,34.323 C93.2@87.439,34.373
NetC110_2: C110.2 R107.2 U14.7 | length 6.9
  Top Layer 1 w0.254: U14.7@88.411,23.355 92.059,23.355 92.915,24.21 C110.2@92.965,24.21 93.089,24.086 R107.2@94.87,24.086
NetC111_2: C111.2 R105.2 U14.6 | length 6.6
  Top Layer 1 w0.254: U14.6@88.411,22.704 92.519,22.704 92.915,22.308 C111.2@92.965,22.308 R105.2@94.87,22.308
NetC112_2: C112.2 R106.1 U14.11 | length 8.9
  Top Layer 1 w0.254: R106.1@75.811,21.292 C112.2@75.811,23.144 ; C112.2@75.811,23.172 81.223,23.172 81.673,22.721 82.661,22.721 U14.11@82.678,22.704
NetC113_2: C113.2 R108.1 U14.10 | length 4.9
  Top Layer 1 w0.254: R108.1@78.233,24.349 78.286,24.402 C113.2@80.138,24.402 80.247,24.293 80.82,24.293 81.741,23.372 82.661,23.372 U14.10@82.678,23.355
NetC133_1: C133.1 R36.2 R78.1 | length 4.1
  Top Layer 1 w0.254: R36.2@58.04,23.714 60.018,23.714 C133.1@60.072,23.767 62.05,23.767 R78.1@62.104,23.714
NetC134_1: C134.1 R65.2 R81.1 | length 4.3
  Top Layer 1 w0.254: R81.1@78.233,32.468 C134.1@78.233,30.563 78.233,30.513 78.506,30.24 78.556,30.24 79.367,29.429 R65.2@79.367,28.658
NetC141_2: C141.2 U6.5 | length 3
  Top Layer 1 w0.254: U6.5@72.858,13.139 72.858,12.697 v1(73.534,12.021)
  Bottom Layer w0.254: C141.2@72.645,13.226 72.695,13.226 73.446,12.475 73.446,12.109 v1(73.534,12.021)
NetD5_1: D5.1 R15.2 | length 1.6
  Bottom Layer w0.254: D5.1@22.79,37.87 22.793,37.87 22.917,37.993 22.79,37.993 R15.2@22.79,39.336
NetD6_1: D6.1 R18.2 | length 1.7
  Bottom Layer w0.254: D6.1@36.699,37.296 36.699,38.822 R18.2@36.831,38.954